# Altium PCB PCB-MAIN.PcbDoc (part 2 of 3)
Units mm, origin at the board's own origin, x right, y up, seen from the top; angles counter-clockwise.
Board outline 110 x 75 mm, 6 copper layers (F.Cu, In1.Cu, In2.Cu, In3.Cu, In4.Cu, B.Cu); 251 components, 186 nets, 1143 pads, 304 vias.
Unrouted connection lines stored in the file: 421.
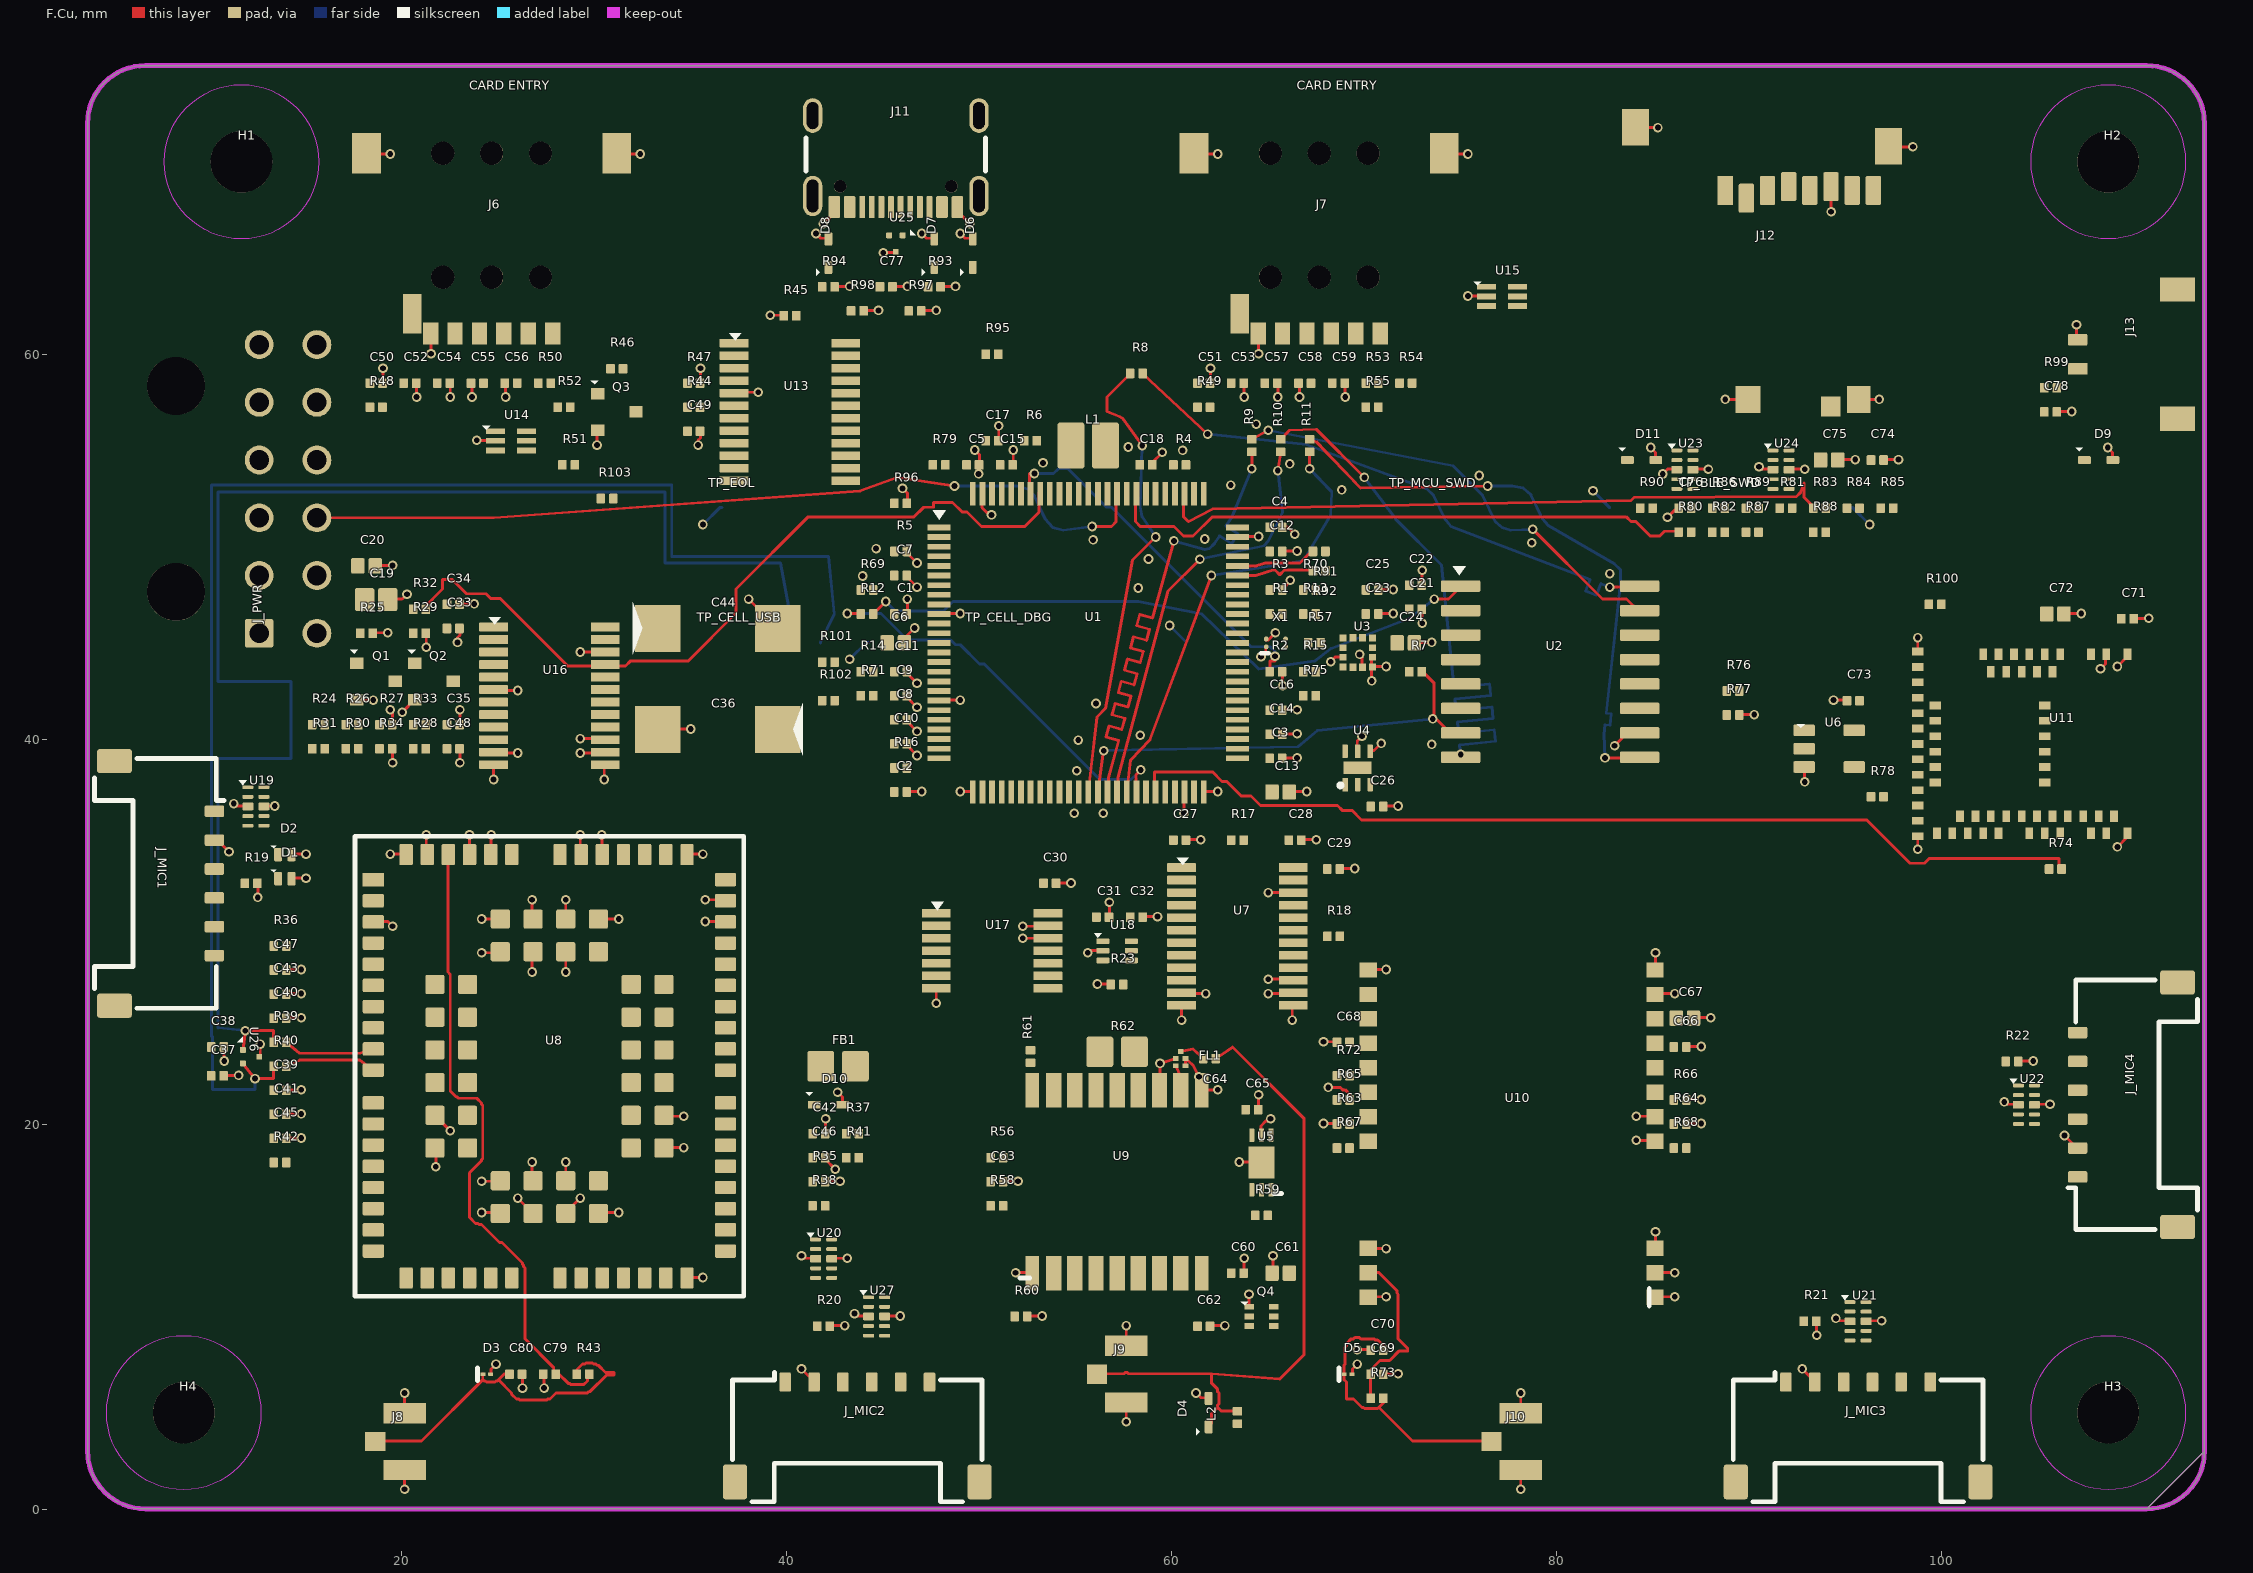
[diagram p0: F.Cu view]

## Via types
v1: diameter 0.5, hole 0.3, F.Cu to B.Cu, tented both sides, 304 vias

## Nets (pads, with @x,y where several pads share a name; then routed paths per layer and width w, separated by ;. In a path a pad name is that pad's centre, name@x,y a point inside that pad or via, vN(x,y) a via of type N, cw(c..) or ccw(c..) an arc to the next point about the centre after c; other vN are vias at no path point) (continued)
CELL_DBG_VREF_TP: R41.2 U27.4
CELL_DTR_U16: R29.1 U1.61 U16.16
CELL_PWRKEY_CMD: R24.1 U1.58
CELL_RESET_N_CMD: R26.1 U1.59
CELL_RF: C79.1 R43.1 U8.60 | length 33.1
  F.Cu w0.151: U8.60@22.41,34.05 22.41,27.925 22.535,27.8 22.535,21.738 22.847,21.425 22.91,21.425 22.972,21.362 23.91,21.362 24.16,21.113 24.16,21.05 24.222,20.988 24.222,18.238 24.16,18.175 24.16,18.113 23.535,17.488 23.535,15.175 23.847,14.863 23.972,14.863 24.035,14.8 24.16,14.8 25.097,13.863 25.222,13.863 26.285,12.8 26.285,12.738 26.347,12.675 26.347,12.613 26.41,12.55 26.41,8.863 27.91,7.362 27.91,7.175 28.035,7.05 28.16,7.05 28.66,6.55 28.722,6.55 28.785,6.488 29.472,6.488 29.66,6.675 29.66,6.925 R43.1@29.785,7.05
CELL_RF_ANT: C80.1 D3.1 J8.1 R43.2 | length 18.4
  F.Cu w0.151: J8.1@18.66,3.55 21.035,3.55 24.222,6.737 ; D3.1@24.222,7.05 24.222,6.737 ; 25.035,6.737 25.722,6.05 25.722,5.988 25.972,5.738 26.097,5.738 26.16,5.675 27.535,5.675 27.597,5.738 27.722,5.738 28.035,6.05 29.66,6.05 29.722,6.112 29.785,6.112 30.66,6.988 31.035,6.988 31.035,7.113 30.597,7.113 30.222,7.488 30.16,7.488 30.097,7.55 29.972,7.55 29.91,7.613 29.597,7.613 29.535,7.55 29.41,7.55 29.097,7.238 R43.2@29.097,7.05 ; C80.1@25.598,7.05 25.347,7.05 24.973,6.675 24.91,6.675 24.847,6.613 24.41,6.613 24.348,6.675 24.285,6.675 24.222,6.737
CELL_RI_U16: R33.2 U1.62 U16.19
CELL_RX_U16: R32.2 U1.93 U16.21 | length 41
  F.Cu w0.15: R32.2@21.135,46.825 22.135,47.825 22.135,48.325 22.635,48.325 23.385,47.575 24.385,47.575 24.635,47.325 25.135,47.325 28.635,43.825 30.635,43.825 31.635,43.825 31.885,44.075 34.885,44.075 37.385,46.575 37.385,47.825 41.135,51.575 46.635,51.575 47.135,52.075 47.635,52.075 47.635,52.325 48.635,52.325 49.135,51.825 49.385,51.825 50.135,51.075 52.385,51.075 53.135,51.825 U1.93@53.135,52.825
CELL_STATUS_U16: R34.1 U1.60 U16.20
CELL_TX_U16: R28.2 U1.92 U16.17
CELL_USB_BOOT_1V8: R35.1 R38.2 U8.75
CELL_USB_BOOT_TP: R38.1 TP_CELL_DBG.4 U27.5
CELL_USB_DM_TP: R40.2 TP_CELL_USB.3 U26.2 | length 77.3
  F.Cu w0.154: U26.2@11.76,23.175 v1(12.385,22.384) 13.36,22.384 R40.2@13.36,23.025
  B.Cu w0.154: v1(12.385,22.384) 12.385,21.825 10.185,21.825 10.185,24.579 10.115,24.579 10.115,53.225 34.042,53.225 34.042,49.525 42.185,49.525 42.485,46.525 TP_CELL_USB.3@41.765,45.025
CELL_USB_DM_U8: R40.1 U8.10 | length 4.8
  F.Cu w0.154: R40.1@14.01,23.025 14.71,23.344 17.835,23.344 U8.10@18.535,22.825
CELL_USB_DP_TP: R39.2 TP_CELL_USB.2 U26.1 | length 77.3
  F.Cu w0.154: U26.1@11.76,23.875 v1(11.885,24.875) 13.36,24.875 R39.2@13.36,24.275
  B.Cu w0.154: v1(11.885,24.875) 10.472,25.025 10.472,39.025 14.257,39.025 14.257,43.025 10.472,43.025 10.472,52.868 33.685,52.868 33.685,49.168 39.685,49.168 40.185,46.525 TP_CELL_USB.2@39.225,45.025
CELL_USB_DP_U8: R39.1 U8.9 | length 4.8
  F.Cu w0.154: R39.1@14.01,24.275 14.71,23.701 17.835,23.701 U8.9@18.535,23.925
CELL_USB_VBUS: D10.1 TP_CELL_USB.1 U8.8
CELL_USIM_CLK_1V8: U8.46 U13.7
CELL_USIM_DATA_1V8: U8.45 U13.10
CELL_USIM_RST_1V8: U8.44 U13.6
CELL_USIM_VDD_1V8: U8.43 U13.4 U13.9 U13.12
EN_AUX: J_PWR.10 U1.86
EN_MODEM: J_PWR.9 U1.85 | length 44.5
  F.Cu w0.15: J_PWR.9@15.605,51.525 24.785,51.525 43.835,52.925 45.785,53.625 v1(48.735,53.175) ; v1(55.885,51.075) 56.885,51.075 57.135,51.325 U1.85@57.135,52.825
  B.Cu w0.15: v1(48.735,53.175) 51.985,53.175 52.535,53.025 52.885,52.675 53.435,51.475 53.835,51.025 54.385,50.875 v1(55.885,51.075)
FAULT: J_PWR.8 R103.1 TP_EOL.8

## Text inside footprints (layer, text, board x,y; h text height)
J6: F.SilkS "CARD ENTRY" at 23.513,73.598 h0.8
J7: F.SilkS "CARD ENTRY" at 66.513,73.598 h0.8
J11: Dwgs.User "PCB Edge" at 45.127,74.259 h0.5